# Altium PCB TYH-PD67W 2C1A 协议板0722.pcbdoc (part 1 of 2)
Units mm, origin at the board's own origin, x right, y up, seen from the top; angles counter-clockwise.
Board outline 32.75 x 24.76 mm, 5 copper layers (Top Layer, Signal Layer 3, Signal Layer 1, Signal Layer 2, Bottom Layer), stack 0.941 mm thick; 47 components, 178 nets, 247 pads, 161 vias.
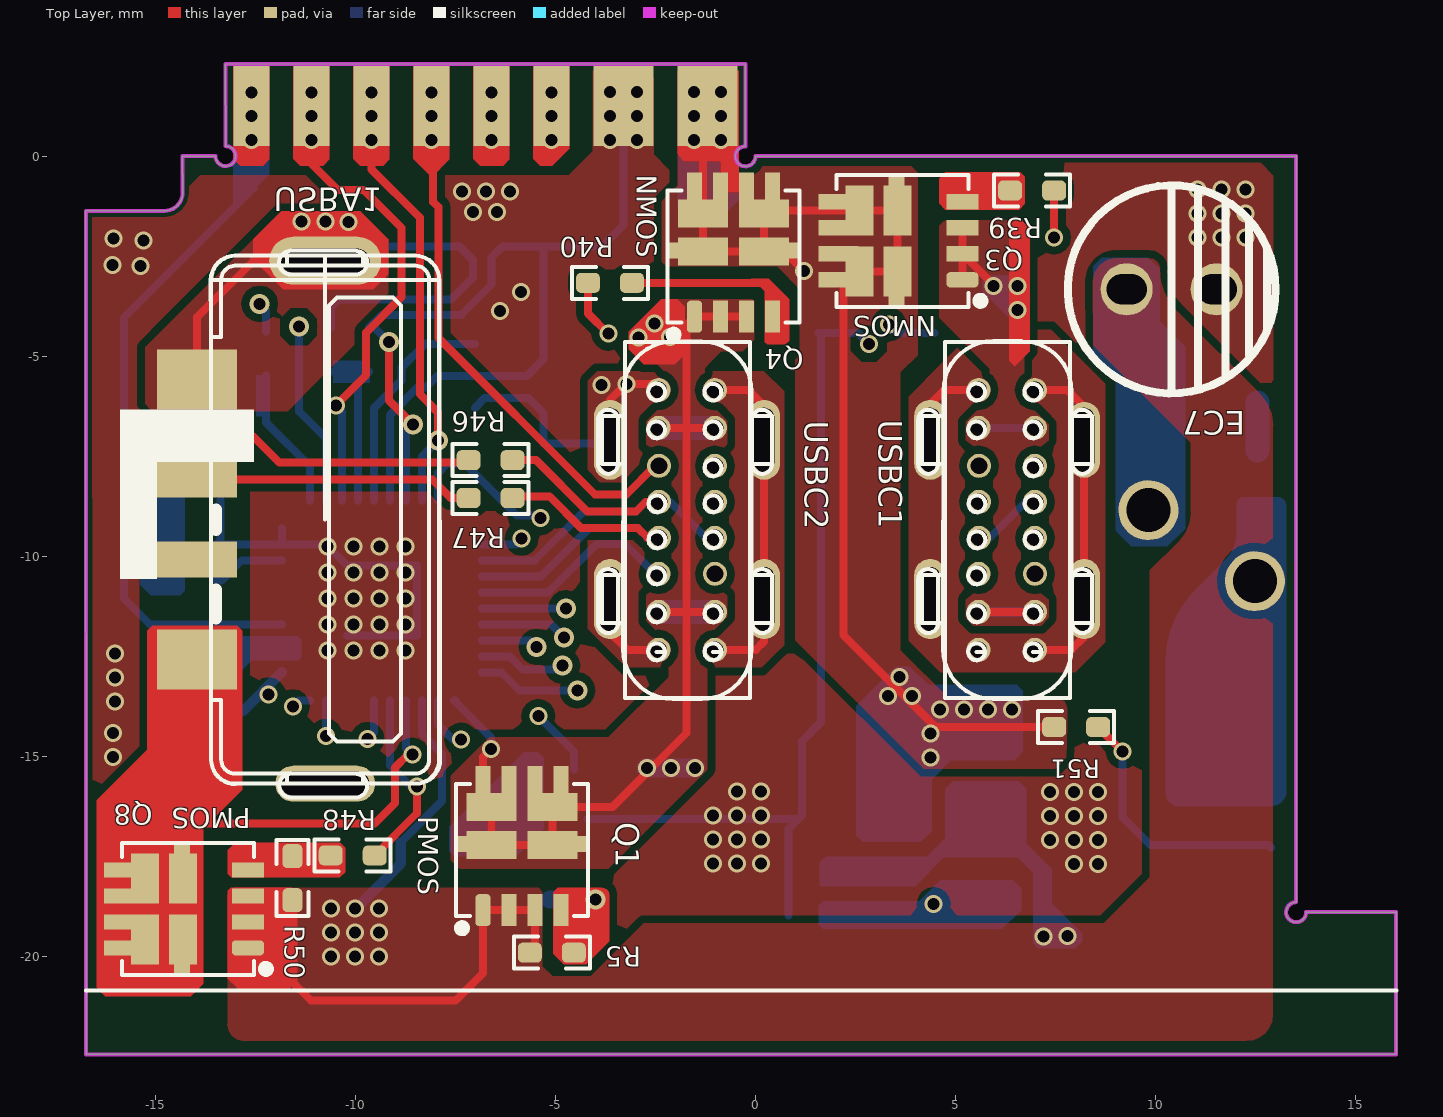
[diagram p0: Top Layer view]
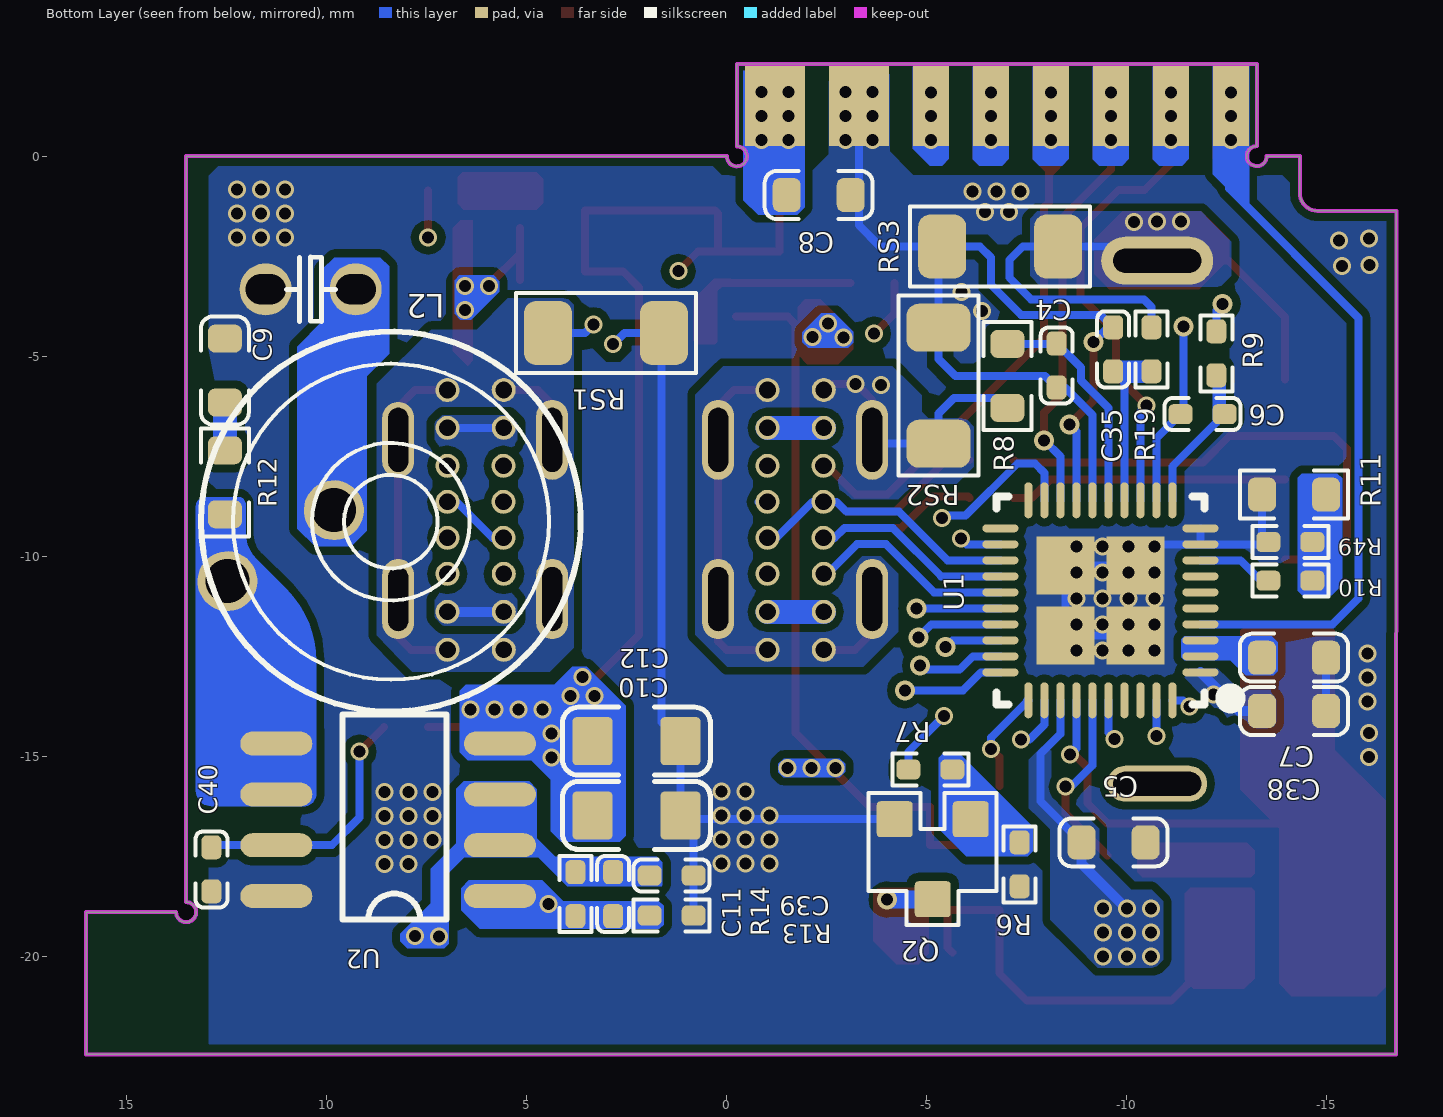
[diagram p1: Bottom Layer view, seen from below]
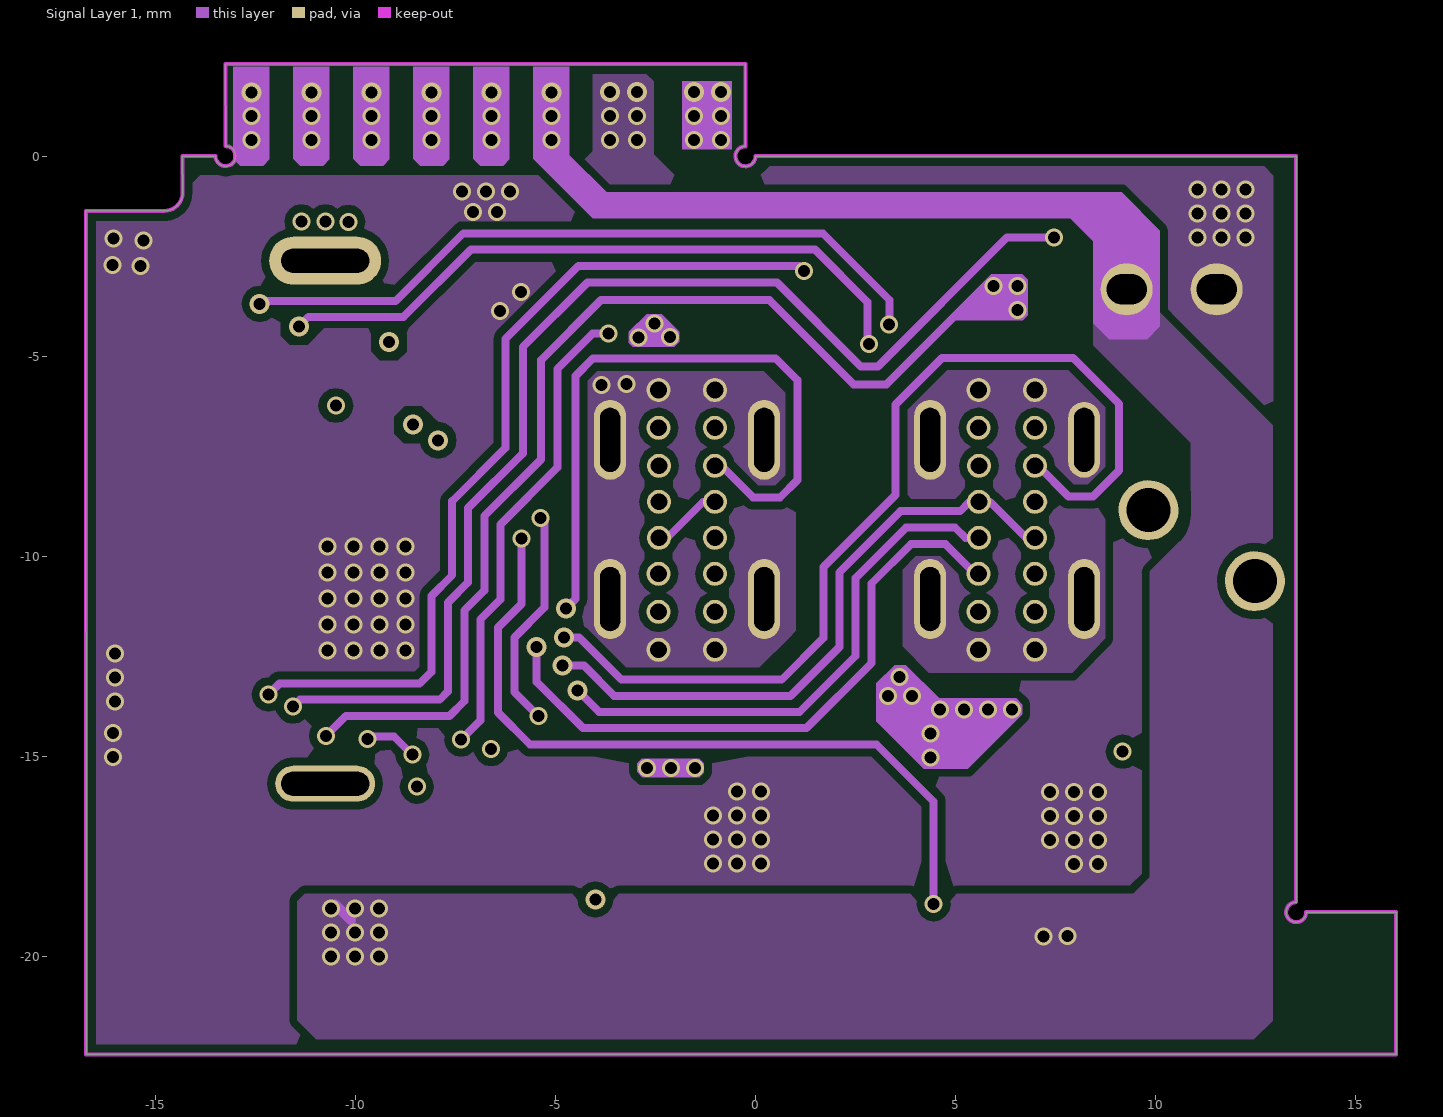
[diagram p2: Signal Layer 1]
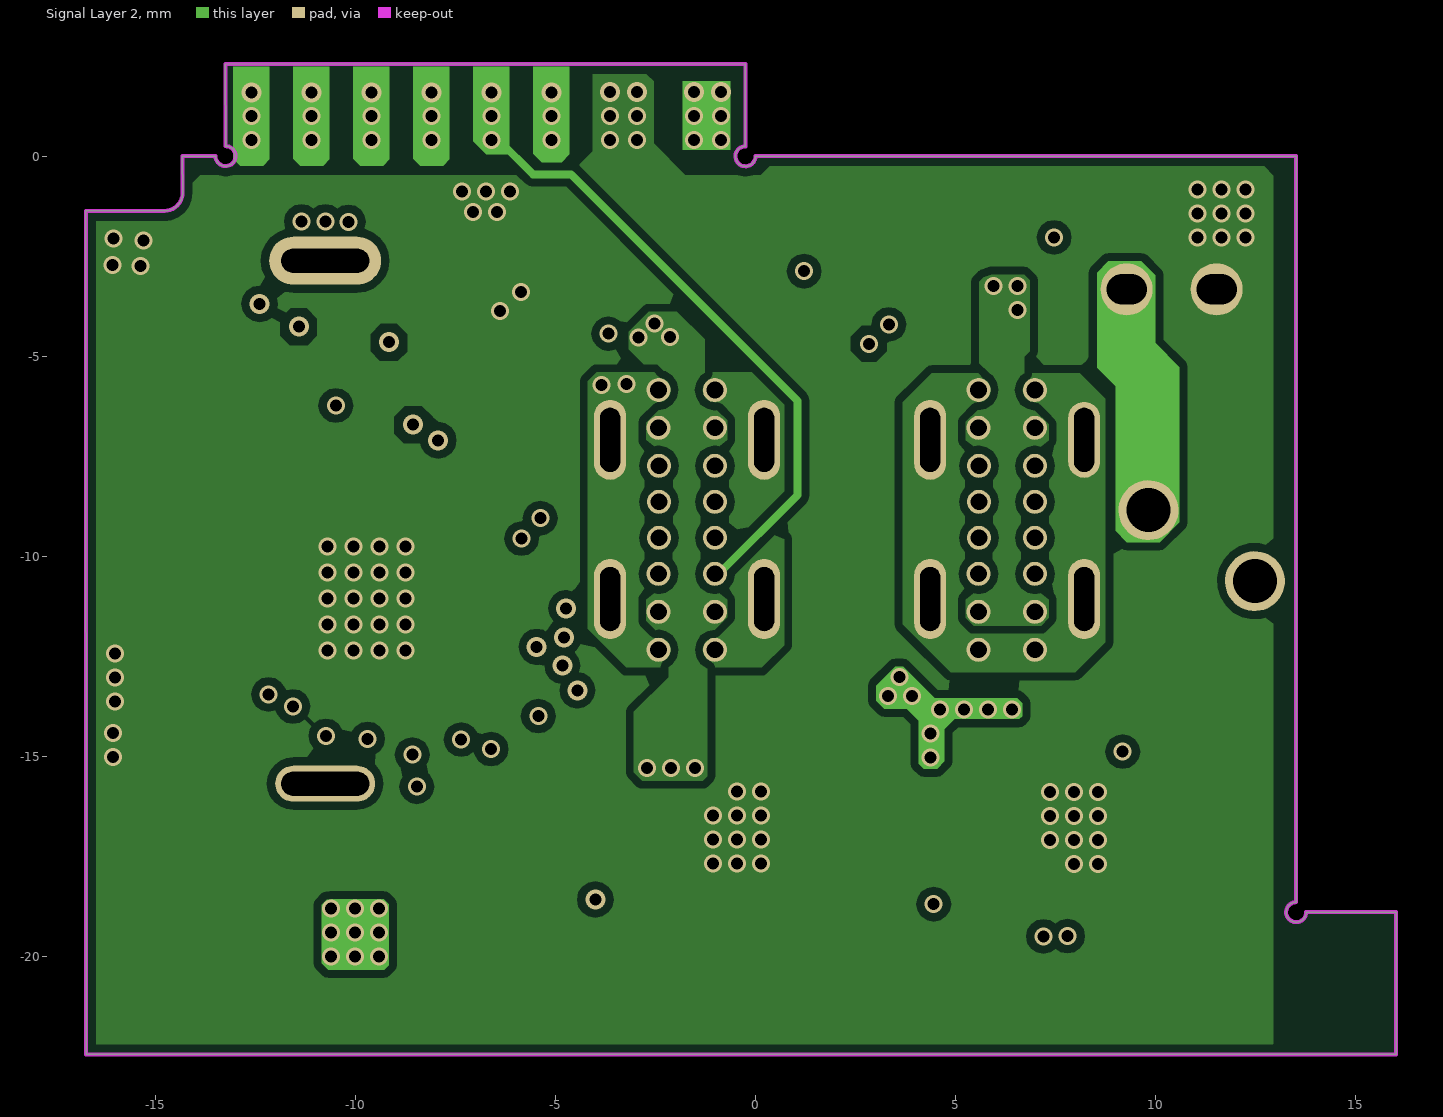
[diagram p3: Signal Layer 2]

## Layer stack, top to bottom
Top Solder: solder mask 0.0102, Solder Resist, Dk 3.5
Top Layer: signal copper 0.0356
Dielectric 1: core 0.254, FR-4, Dk 4.2
Signal Layer 3: signal copper 0.036
Dielectric 4: prepreg 0.127, Dk 4.2
Signal Layer 1: signal copper 0.036
Dielectric 2: core 0.254, Dk 4.2
Signal Layer 2: signal copper 0.036
Dielectric 3: prepreg 0.127, Dk 4.2
Bottom Layer: signal copper 0.0356
Bottom Solder: solder mask 0.0102, Solder Resist, Dk 3.5

## Board outline
-16.736,-22.453 -16.741,-1.367 -14.775,-1.363 ccw(c-14.776,-0.913) -14.326,-0.911 -14.33,0.004 -13.501,0.004 ccw(c-13.251,0.004) -13.251,0.254 -13.255,2.304 -13.255,2.303 -0.255,2.308 -0.255,2.304 -0.255,0.25 ccw(c-0.255,0) -0.005,0 -0.005,0.004 13.514,0.004 13.514,-18.646 ccw(c13.514,-18.896) 13.764,-18.896 16.014,-18.896 16.014,-22.453

## Design rules (kind name [scope] priority, off if disabled: settings)
Clearance Clearance_22 [InNet('HV') vs InNet('SW')] p1: gap=1.2
Clearance Clearance_21 [InNet('NetRX3_2') vs InNet('PGND')] p2: gap=1.5
Clearance Clearance_20 [InNet('NetBD1_1') vs InNet('PGND')] p3: gap=1.5
Clearance Clearance_19 [InNet('NetC4_2') vs InNet('PGND')] p4: gap=0.4
Clearance Clearance_18 [InNet('NetR15_1') vs InNet('PGND')] p5: gap=1
Clearance Clearance_17 [InNet('NetN_1') vs InNet('NetBD1_1')] p6: gap=1.55
Clearance Clearance_16 [InNet('NetN_1') vs InNet('PGND')] p7: gap=1.5
Clearance Clearance_15 [InNet('VIN') vs InNet('PGND')] p8 off: gap=5.8
Clearance Clearance_14 [InNet('CS') vs InNet('Bais-L')] p9: gap=0.45
Clearance Clearance_13 [InNet('SW') vs InNet('CS')] p10: gap=1.5
Clearance Clearance_12 [InNet('NetR15_1') vs InNet('CS')] p11: gap=1
Clearance Clearance_11 [InNet('NetBD1_3') vs InNet('CS')] p12: gap=1.1
Clearance Clearance_10 [InNet('HV') vs InNet('CS')] p13: gap=1.1
Clearance Clearance_9 [InNet('NetL2_1') vs InNet('CS')] p14: gap=1.5
Clearance Clearance_8 [InNet('NetC1_2') vs InNet('PGND')] p15: gap=1.2
Clearance Clearance_7 [InNet('NetBD1_3') vs InNet('PGND')] p16: gap=1.2
Clearance Clearance_6 [InNet('NetC2_2') vs InNet('PGND')] p17: gap=1.3
Clearance Clearance_5 [InNet('Bais-L') vs InNet('PGND')] p18: gap=0.45
Clearance Clearance_4 [InNet('SW') vs InNet('PGND')] p19: gap=1.5
Clearance Clearance_3 [InNet('HV') vs InNet('PGND')] p20: gap=1.2
Clearance Clearance_2 [InNet('NetL2_1') vs InNet('PGND')] p21: gap=1.5
Clearance Clearance_1 [OnLayer('Keep-Out Layer')] p22: gap=0.1
Clearance [All] p23: gap=0.2
PlaneConnect [All] p1: planeconnectstyle=Direct reliefexpansion=0.508 reliefentries=4 reliefconductorwidth=0.3 reliefairgap=0.254
PolygonConnect [All] p1: connectstyle=Direct reliefconductorwidth=0.3 reliefentries=4 polygonreliefangle="90 Angle" airgapwidth=0.3
RoutingVias [All] p1: holewidth=0.711 width=1.27 viastyle="Through Hole" minholewidth=0.711 minwidth=1.27 maxholewidth=0.711 maxwidth=1.27
SolderMaskExpansion [All] p1: expansion=0.05
Width [All] p1: maxlimit=10 minlimit=0.1 preferedwidth=0.2
28 further rules are at their usual default settings.

## Components (designator, comment, footprint, x,y, rotation, side; value= is the part's Value field where it differs from the comment)
C4 "0.1uF" 0402C -8.649,-4.279 r270 bottom
C5 "1uF" 0603CX -10.471,-17.151 r0 bottom
C6 "0.1uF" 0402C -12.847,-6.846 r0 bottom
C7 "1uF" 0603CX -13.383,-12.535 r180 bottom
C8 "1uF" 0603CX -1.501,-0.968 r180 bottom
C9 "100nF/50V/0603" 0603CX 12.546,-4.556 r270 bottom
C10 "2.2nF/250V/0805" 0805C 2.258,-16.481 r180 bottom
C11 "33nF/25V/0402" 0402C 3.238,-19.396 r90 bottom (schematic designator C21)
C12 "100nF/50V/0603" 0805C 2.258,-14.622 r180 bottom (schematic designator C9)
C35 "0.1uF" 0402C -9.262,-5.776 r90 bottom
C38 "1uF" 0603CX -14.984,-13.868 r0 bottom
C39 "33nF/25V/0402" 0402C 2.328,-17.579 r180 bottom (schematic designator C21)
C40 "33nF/25V/0402" 0402C 13.283,-18.777 r90 bottom (schematic designator C21)
EC7 "560uF/25V/6.3*16" EG-5*8L 9.413,-3.334 r90 top (schematic designator EC6)
L2 "Comment" L-T31125W 8.395,-9.134 r340 bottom
Q1 "PPM8PN03R10" DFN3*3 -6.603,-16.271 r0 top
Q2 "2N7002KL SOT-23" SOT-23_R -5.151,-17.573 r0 bottom (schematic designator Q8)
Q3 "PNM8PN30V50A" DFN3*3 2.595,-2.876 r90 top
Q4 "PNM8PN30V50A" DFN3*3 -1.314,-1.432 r0 top
Q8 "PPM8PN03R10" DFN3*3 -15.268,-19.578 r90 top
R5 "10K" 0402R#1 -5.646,-19.909 r0 top (schematic designator R4)
R6 "10K" 0402R#1 -7.325,-17.151 r270 bottom (schematic designator R4)
R7 "2K" 0402R#1 -4.54,-15.331 r180 bottom (schematic designator R4)
R8 "100R" 0603RX#1 -7.019,-5.489 r270 bottom (schematic designator R4)
R9 "100R" 0402r -12.239,-4.926 r270 bottom (schematic designator R4)
R10 "10K" 0402R#2 -14.09,-10.608 r0 bottom (schematic designator R4)
R11 "100K" 0603Rx -13.383,-8.456 r180 bottom (schematic designator R4)
R12 "10R/1206" 0603RX#2 12.546,-7.349 r270 bottom (schematic designator R6)
R13 "1K/0402" 0402R#1 1.928,-18.98 r180 bottom (schematic designator R22)
R14 "1K/0402" 0402R#1 3.783,-17.896 r270 bottom (schematic designator R22)
R19 "100R" 0402R#1 -10.619,-4.276 r270 bottom (schematic designator R4)
R39 "100R" 0402R#1 7.463,-0.855 r180 top (schematic designator R4)
R40 "100R" 0402R#1 -3.092,-3.163 r180 top (schematic designator R4)
R46 "100R" 0402R#1 -6.075,-7.596 r180 top (schematic designator R4)
R47 "100R" 0402R#1 -6.075,-8.54 r180 top (schematic designator R4)
R48 "100R" 0402R#1 -10.622,-17.477 r0 top (schematic designator R4)
R49 "10K" 0402R#2 -14.09,-9.642 r0 bottom (schematic designator R4)
R50 "100R" 0402R#1 -11.578,-18.597 r90 top (schematic designator R4)
R51 "1K/0402" 0402R#1 8.563,-14.269 r180 top (schematic designator R22)
RS1 "5mR/1206/1%" 1206RA 0.82,-5.418 r0 bottom (schematic designator RS2)
RS2 "5mR/1206" 1206RA -4.298,-7.935 r90 bottom
RS3 "5mR/1206" 1206RA -4.636,-1.253 r180 bottom (schematic designator RS2)
U1 "Comment" "QFN40 5*5" -9.343,-11.1 r0 bottom
U2 "Comment" SO-8S 5.671,-18.493 r90 bottom
USBA1 "Comment" "USB AF SMD-L" -10.761,-9.084 r180 top locked
USBC1 "Comment" "USB C 16P 立式"#1 6.298,-9.093 r270 top locked
USBC2 "Comment" "USB C 16P 立式"#2 -1.703,-9.093 r270 top locked

## Footprints (in the part's own frame and the unit in brackets; to place one, negate y for a bottom-side part, rotate by r counter-clockwise, add the part's x,y. Pads: shape width x height; smd on the part's side, far side on the other; paste and mask are expansions set on the pad)
0402C [mm]
  rrect50% 0.6x0.5 smd: 1(0.4,-0.4) 2(1.5,-0.4)
  silkscreen extent 0,-0.8 1.9,0, body extent 0.45,-0.66 1.45,-0.14, height 0.53
0402R#1 [mm]
  rrect50% 0.6x0.5 smd: 1(0,0) 2(1.1,0)
  silkscreen extent -0.4,-0.4 1.5,0.4, body extent 0.05,-0.25 1.05,0.25, height 0.3
0402R#2 [mm]
  rrect50% 0.6x0.5 smd: 1(-0.55,0) 2(0.55,0)
  silkscreen extent -0.95,-0.4 0.95,0.4, body extent -0.5,-0.25 0.5,0.25, height 0.3
0402r [mm]
  rrect50% 0.6x0.5 smd: 1(-0.55,0) 2(0.55,0)
  silkscreen extent -0.95,-0.4 0.95,0.4, body extent -0.5,-0.25 0.5,0.25, height 0.3
0603CX [mm]
  rrect50% 0.7x0.85 smd: 1(0,0) 2(1.6,0)
  silkscreen extent -0.55,-0.6 2.15,0.6, body extent 0,-0.41 1.6,0.41, height 0.81
0603RX#1 [mm]
  rrect50% 0.7x0.85 smd: 1(-0.8,0) 2(0.8,0)
  silkscreen extent -1.35,-0.6 1.35,0.6, body extent -0.77,-0.42 0.78,0.43, height 0.45
0603RX#2 [mm]
  rrect50% 0.7x0.85 smd: 1(0,0) 2(1.6,0)
  silkscreen extent -0.55,-0.6 2.15,0.6, body extent 0.03,-0.42 1.58,0.43, height 0.45
0603Rx [mm]
  rrect50% 0.7x0.85 smd: 1(0,0) 2(1.6,0)
  silkscreen extent -0.55,-0.6 2.15,0.6, body extent 0.03,-0.42 1.58,0.43, height 0.45
0805C [mm]
  rrect20% 1x1.2 smd: 1(-1.099,0.001) 2(1.101,0.001)
  silkscreen extent -1.85,-0.85 1.85,0.85, body extent -1,-0.61 1,0.61, height 0.51
1206RA [mm]
  rrect50% 1.2x1.6 smd mask+0.03: 1(3.65,-1) 2(0.75,-1)
  silkscreen extent -0.05,-2 4.45,0, body extent 0.6,-1.8 3.8,-0.2, height 0.55
DFN3*3 [mm]
  rrect50% 0.38x0.8 smd: 1(-0.212,-2.576)
  rect 0.38x0.8 smd: 2(0.438,-2.576) 3(1.088,-2.576) 4(1.738,-2.576)
  rect 0.38x1 smd: 5(1.738,0.524) 6(1.088,0.524) 7(0.438,0.524) 8(-0.212,0.524)
  rect 0.8x0.4 smd: 8(-0.458,-0.926) 8(2.034,-0.926)
  rect 1.25x0.7 smd: 8(0,-0.952) 8(0,0) 8(1.526,-0.952) 8(1.526,0)
  silkscreen extent -0.89,-3.18 2.41,0.57, body extent -0.89,-2.74 2.41,0.58, height 0.75
EG-5*8L [mm]
  round 1.3 hole 0.75 slot 1 at 90 deg: 1(0.009,0.137) 2(0.009,-2.113)
  silkscreen extent -2.59,-3.59 2.61,1.61, body extent -2.49,-3.49 2.51,1.51, height 7
L-T31125W [mm]
  round 1.5 hole 1.1: 1(1.241,-0.758) 2(4.35,0)
  silkscreen extent -4.75,-4.75 4.75,4.75, body extent -4.77,-4.77 4.77,4.77, height 4.86
"QFN40 5*5" [mm]
  oval 0.9x0.2 smd: 1(-2.5,1.8) 2(-2.5,1.4) 3(-2.5,1) 4(-2.5,0.6) 5(-2.5,0.2) 6(-2.5,-0.2) 7(-2.5,-0.6) 8(-2.5,-1) 9(-2.5,-1.4) 10(-2.5,-1.8) 21(2.5,-1.8) 22(2.5,-1.4) 23(2.5,-1) 24(2.5,-0.6) 25(2.5,-0.2) 26(2.5,0.2) 27(2.5,0.6) 28(2.5,1) 29(2.5,1.4) 30(2.5,1.8)
  oval 0.2x0.9 smd: 11(-1.8,-2.5) 12(-1.4,-2.5) 13(-1,-2.5) 14(-0.6,-2.5) 15(-0.2,-2.5) 16(0.2,-2.5) 17(0.6,-2.5) 18(1,-2.5) 19(1.4,-2.5) 20(1.8,-2.5) 31(1.8,2.5) 32(1.4,2.5) 33(1,2.5) 34(0.6,2.5) 35(0.2,2.5) 36(-0.2,2.5) 37(-0.6,2.5) 38(-1,2.5) 39(-1.4,2.5) 40(-1.8,2.5)
  rect 1.45x1.45 smd: 41(-0.875,-0.875) 41(-0.875,0.875) 41(0.875,-0.875) 41(0.875,0.875)
  silkscreen extent -3.37,-2.6 2.6,2.6, body extent -2.45,-2.45 2.45,2.45, height 0.8
SO-8S [mm]
  oval 0.6x1.8 smd: 1(0,0) 2(1.27,0) 3(2.54,0) 4(3.81,0) 5(3.81,5.588) 6(2.54,5.588) 7(1.27,5.588) 8(0,5.588)
  silkscreen extent -0.59,1.34 4.54,3.94, body extent -0.59,-0.26 4.41,5.74, height 1.9
SOT-23_R [mm]
  rrect20% 0.9x0.9 smd: 1(-0.95,-1) 2(0.95,-1) 3(0,1)
  silkscreen extent -1.6,-1.65 1.6,1.65, body extent -1.46,-1.44 1.44,1.36, height 1.2
"USB AF SMD-L" [mm]
  oval 2.5x0.9 hole 0.6 slot 2.2 at 0 deg: 0(0,6.6)
  oval 2.8x1.2 hole 0.6 slot 2.2 at 0 deg: 0(0,-6.475)
  rect 2x1.5 smd: +(3.198,3.5) -(3.198,-3.5)
  rect 2x0.9 smd: D+P(3.198,-1) D-M(3.198,1)
  silkscreen extent -2.85,-6.6 2.85,6.6, body extent -2.9,-6.61 3.42,6.61, height 10
"USB C 16P 立式"#1 [mm]
  round 0.6 hole 0.42: CC1(-1.355,0.685) CC2(1.345,-0.725) DM(-0.455,-0.715) DM(0.445,0.685) DP(-0.455,0.685) DP(0.445,-0.715) GND(-3.253,-0.723) GND(-3.247,0.684) GND(3.245,-0.725) GND(3.245,0.685) SBU1(1.345,0.685) SBU2(-1.355,-0.715) VBUS(-2.305,-0.725) VBUS(-2.305,0.685) VBUS(2.295,-0.725) VBUS(2.295,0.685)
  oval 2x0.8 hole 0.5 slot 1.6 at 0 deg: GND(-2.005,-1.935) GND(1.975,1.915) GND(1.975,-1.935)
  oval 1.9x0.8 hole 0.5 slot 1.6 at 0 deg: GND(-2.005,1.915)
  silkscreen extent -4.45,-2.13 4.46,2.12, body extent -4.47,-2.08 4.47,2.08, height 10
"USB C 16P 立式"#2 [mm]
  round 0.6 hole 0.42: CC1(-1.355,0.685) CC2(1.345,-0.725) DM(-0.455,-0.715) DM(0.445,0.685) DP(-0.455,0.685) DP(0.445,-0.715) GND(-3.253,-0.723) GND(-3.247,0.684) GND(3.245,-0.725) GND(3.245,0.685) SBU1(1.345,0.685) SBU2(-1.355,-0.715) VBUS(-2.305,-0.725) VBUS(-2.305,0.685) VBUS(2.295,-0.725) VBUS(2.295,0.685)
  oval 2x0.8 hole 0.5 slot 1.6 at 0 deg: GND(-2.005,-1.935) GND(-2.005,1.915) GND(1.975,1.915) GND(1.975,-1.935)
  silkscreen extent -4.45,-2.13 4.46,2.12, body extent -4.47,-2.08 4.47,2.08, height 10

## Part data
C9 C12: library part "Cap Semi", "Capacitor (Semiconductor SIM Model)"
C10: library part CAP
C11 C39 C40: library part Cap, "Capacitor"
EC7: library part CAPACITOR, "C?"
Q2: library part NMOS
R5 R6 R7 R8 R9 R10 R11 R19 R39 R40 R46 R47 R48 R49 R50 RS1 RS2 RS3: library part RES, "Resistor"
R12 R13 R14 R51: library part Res1, "Resistor"

## Free pads (board coordinates)
  rect 1.5x2 smd far side: 0(-3.305,1.254) 1(-1.205,1.254)
  rect 1.5x2 smd: 0(-3.305,1.254) 1(-1.205,1.254)
  rect 0.9x2 smd far side: 2(-12.605,1.254) 2(-11.105,1.254) 2(-9.605,1.254) 2(-8.105,1.254) 2(-6.605,1.254) 2(-5.105,1.254)
  rect 0.9x2 smd: 2(-12.605,1.254) 2(-11.105,1.254) 2(-9.605,1.254) 2(-8.105,1.254) 2(-6.605,1.254) 2(-5.105,1.254)

## Via types
v1: diameter 0.45, hole 0.3, Top Layer to Bottom Layer, tented both sides, 140 vias
v2: diameter 0.5, hole 0.3, Top Layer to Bottom Layer, tented both sides, 21 vias

## Nets (pads, with @x,y where several pads share a name; then routed paths per layer and width w, separated by ;. In a path a pad name is that pad's centre, name@x,y a point inside that pad or via, vN(x,y) a via of type N, cw(c..) or ccw(c..) an arc to the next point about the centre after c; other vN are vias at no path point)
3.3V: 
A: 
A+: Q8.5 Q8.6 Q8.7 Q8.8 U1.34 U1.36 USBA1.+ | length 19.7
  Top Layer w0.2: Q8.8@-15.008,-17.645 -15.008,-19.171 -14.056,-19.171 -13.96,-19.075 -13.96,-16.678 ; -14.112,-16.678 -13.96,-16.678 ; USBA1.+@-13.96,-12.584 -13.96,-16.678 ; v1(-8.584,-14.96) -8.697,-14.96 -9.016,-15.28 -9.016,-16.172 -9.522,-16.678 -13.96,-16.678
  Signal Layer 1 w0.2: v1(-9.699,-14.563) -9.635,-14.499 -9.045,-14.499 v1(-8.584,-14.96)
  Bottom Layer w0.2: v1(-9.699,-14.563) -9.543,-14.407 U1.36@-9.543,-13.6 ; U1.34@-8.743,-13.6 -8.743,-14.801 v1(-8.584,-14.96)
A-: R19.1 RS3.1 USBA1.0@-10.761,-2.609 USBA1.- | length 14.1
  Top Layer w0.2: USBA1.-@-13.96,-5.584 -13.96,-4.021 -12.548,-2.609 USBA1.0@-10.761,-2.609
  Bottom Layer w0.2: USBA1.0@-10.761,-2.609 -10.406,-2.254 RS3.1@-8.286,-2.254 -7.401,-2.254 -7.066,-2.59 -7.066,-3.031 -7.613,-3.579 -10.431,-3.579 -10.619,-3.766 R19.1@-10.619,-4.276
  other v1: -11.355,-1.627 -10.752,-1.627 -10.179,-1.639
BACK_LED: 
Bais-L: 
BOOT0: 
BUTTON: 
CC1: 
CC2: 
CPA: C35.1 R19.2 U1.14 | length 4.3
  Bottom Layer w0.2: R19.2@-10.619,-5.376 C35.1@-9.662,-5.376 -9.943,-5.657 U1.14@-9.943,-8.6
CS: 
D: 
D25_INT: 
D31_EN1: 
D31_EN2: 
D31_INT1: 
D+: R47.2 USBA1.D+P | length 7
  Top Layer w0.2: USBA1.D+P@-13.96,-8.084 -8.08,-8.084 -7.624,-8.54 R47.2@-7.175,-8.54
D-: R46.2 USBA1.D-M | length 12.8
  Top Layer w0.2: USBA1.D-M@-13.96,-10.084 -15.088,-10.084 -15.502,-9.67 -15.502,-7.316 -15.172,-6.986 -12.574,-6.986 -11.907,-7.654 -7.233,-7.654 R46.2@-7.175,-7.596
DM: 
DP: 
EM: 
EN: C40.2 R51.1 U2.7 | length 6.5
  Top Layer w0.2: R51.1@8.563,-14.269 v1(9.178,-14.884)
  Bottom Layer w0.2: v1(9.178,-14.884) 9.178,-16.529 9.873,-17.223 U2.7@11.259,-17.223 12.829,-17.223 C40.2@12.883,-17.277
EN_IC: 
FB: 
FLASH_CLK: 
FLASH_CS: 
FLASH_MISO: 
FLASH_MOSI: 
G-SR: 
GND-C: 
HV: 
ISET: 
KEY: 
KEY1: 
LCD_CS: 
LCD_DC: 
LCD_EN2: 
LCD_MOSI: 
LCD_RES: 
LCD_TE: 
LEDA: 
M: 
N: 
NetBD1_1: 
NetBD1_3: 
NetBD2_1: 
NetC1_1: 
NetC1_2: 
NetC2_2: 
NetC3_2: 
NetC4_1: 
NetC4_2: 
NetC5_2: 
NetC6_1: 
NetC10_2: 
NetC21_1: 
NetC22_1: C9.2 R12.1 | length 1.2
  Bottom Layer w0.6: R12.1@12.546,-7.349 C9.2@12.546,-6.155
NetC24_1: 
NetC25_2: 
NetC26_2: 
NetC30_2: 
NetC31_2: 
NetC100_2: 
NetC101_1: 
NetC101_2: 
NetC112_1: 
NetD4_K: 
NetF1_1: 
NetF1_2: 
NetKEY1_1: 
NetL2_1: 
NetLF1_2: 
NetN_1: 
NetNTC2_1: 
NetQ1_3: 
NetQ3_4: 
NetQ3_G: 
NetR3_1: 
NetR4_1: 
NetR15_1: 
NetR25_2: 
NetR29_1: 
NetR31_2: 
NetR32_2: 
NetR41_2: 
NetR42_2: 
NetR134_1: 
NetRX1_2: 
NetRX3_2: 
NetU1_26: 
NetU1_27: 
NetU1_28: 
NetU1_29: 
NetU1_30: 
NetU1_32: 
NewNet1: U1.25 USBC2.CC2 | length 5.2
  Bottom Layer w0.2: U1.25@-6.843,-10.9 -5.182,-10.9 -3.979,-9.697 -3.258,-9.697 -2.517,-10.438 USBC2.CC2@-2.428,-10.438
NewNet2: Q1.5 Q1.6 Q1.7 Q1.8 Q4.1 Q4.2 Q4.3 U1.31 USBC2.VBUS | length 27.6
  Top Layer w0.2: Q1.8@-6.815,-15.747 -6.815,-15.023 v1(-6.612,-14.82) ; Q1.8@-6.603,-16.271 Q1.8@-6.603,-17.223 Q1.8@-5.077,-17.223 Q1.8@-5.077,-16.271 -3.581,-16.271 -1.723,-14.412 -1.723,-11.388 ; USBC2.VBUS@-2.428,-11.388 -1.723,-11.388 ; USBC2.VBUS@-2.428,-6.788 -1.723,-6.788 ; USBC2.VBUS@-1.018,-11.388 -1.723,-11.388 ; USBC2.VBUS@-1.018,-6.788 -1.723,-6.788 ; Q4.3@-0.226,-4.009 Q4.1@-1.526,-4.009 -1.723,-4.205 -1.723,-6.788 ; -1.723,-11.388 -1.723,-6.788
  Bottom Layer w0.2: U1.31@-7.505,-13.6 U1.31@-7.543,-13.6 -6.612,-14.531 v1(-6.612,-14.82)
  Bottom Layer w0.6: USBC2.VBUS@-2.428,-11.388 USBC2.VBUS@-1.018,-11.388 ; USBC2.VBUS@-2.428,-6.788 USBC2.VBUS@-1.018,-6.788
  other v1: -2.72,-15.287 -2.12,-15.287 -1.52,-15.287 -2.925,-4.524 -2.145,-4.521 -2.526,-4.179
NewNet3: R47.1 U1.24 USBC2.DP | length 11.4
  Top Layer w0.2: R47.1@-6.075,-8.54 -6.034,-8.499 -5.155,-8.499 -4.364,-9.289 -2.946,-9.289 USBC2.DP@-2.697,-9.538 ; USBC2.DP@-2.697,-9.538 USBC2.DP@-2.418,-9.538 USBC2.DP@-2.697,-9.538
  Signal Layer 1 w0.2: USBC2.DP@-2.418,-9.538 -2.211,-9.538 -1.311,-8.638 USBC2.DP@-1.018,-8.638
  Bottom Layer w0.2: U1.24@-6.843,-10.5 -5.362,-10.5 -4.152,-9.289 -2.946,-9.289 -2.697,-9.538 USBC2.DP@-2.418,-9.538 ; USBC2.DP@-1.018,-8.638 USBC2.DP@-0.8,-8.638
NewNet4: R46.1 U1.23 USBC2.DM | length 11.1
  Top Layer w0.2: R46.1@-6.075,-7.596 -5.489,-7.596 -4.2,-8.884 -2.994,-8.884 -2.748,-8.638 USBC2.DM@-2.418,-8.638
  Bottom Layer w0.2: U1.23@-6.843,-10.1 -5.52,-10.1 -4.304,-8.884 -2.994,-8.884 -2.748,-8.638 USBC2.DM@-2.418,-8.638 -2.142,-8.638 -1.242,-9.538 USBC2.DM@-1.018,-9.538
NewNet5: U1.26 USBC2.CC1 | length 19
  Signal Layer 1 w0.2: v2(-4.74,-11.3) -4.504,-11.064 -4.504,-5.491 -4.063,-5.05 0.497,-5.05 1.044,-5.597 1.044,-8.096 0.616,-8.525 -0.063,-8.525 -0.849,-7.738 USBC2.CC1@-1.018,-7.738
  Bottom Layer w0.2: U1.26@-6.843,-11.3 v2(-4.74,-11.3)
NewNet6: Q4.4 R40.1 R40.2 U1.32 | length 18.9
  Top Layer w0.2: R40.2@-4.192,-3.163 -4.192,-3.926 v1(-3.683,-4.436) ; R40.1@-3.092,-3.163 0.18,-3.163 0.424,-3.406 Q4.4@0.424,-4.009
  Signal Layer 1 w0.2: v1(-7.36,-14.581) -6.88,-14.1 -6.88,-11.574 -6.38,-11.074 -6.38,-9.202 -4.959,-7.781 -4.959,-5.317 -4.077,-4.436 v1(-3.683,-4.436)
  Bottom Layer w0.2: U1.32@-7.943,-13.6 -7.943,-14.208 -7.569,-14.581 v1(-7.36,-14.581)
NewNet7: 
NewNet8: U1.27 USBC1.CC1 | length 27
  Signal Layer 1 w0.2: v2(-4.792,-12.025) -4.415,-12.025 -3.355,-13.085 0.653,-13.085 1.7,-12.038 1.7,-10.264 3.499,-8.464 3.499,-6.206 4.662,-5.042 7.94,-5.042 9.084,-6.186 9.084,-7.854 8.436,-8.502 7.825,-8.502 7.061,-7.738 USBC1.CC1@6.983,-7.738
  Bottom Layer w0.2: U1.27@-6.843,-11.7 -5.117,-11.7 v2(-4.792,-12.025)
NewNet9: U1.29 USBC1.DM | length 17.8
  Signal Layer 1 w0.2: v2(-4.83,-12.733) -4.292,-12.733 -3.534,-13.49 0.874,-13.49 2.099,-12.265 2.099,-10.399 3.626,-8.873 5.114,-8.873 5.349,-8.638 5.857,-8.638 6.757,-9.538 USBC1.DM@6.983,-9.538
  Bottom Layer w0.2: U1.29@-6.843,-12.5 -6.155,-12.5 -5.82,-12.834 -4.932,-12.834 v2(-4.83,-12.733)
NewNet10: U1.30 USBC1.DP | length 18
  Signal Layer 1 w0.2: v2(-4.455,-13.35) -3.918,-13.887 1.103,-13.887 2.503,-12.487 2.503,-10.54 3.758,-9.285 4.99,-9.285 5.244,-9.538 USBC1.DP@5.583,-9.538 ; USBC1.DP@6.983,-8.638 USBC1.DP@7.192,-8.638
  Bottom Layer w0.2: U1.30@-6.843,-12.9 -6.357,-12.9 -5.907,-13.35 v2(-4.455,-13.35) ; USBC1.DP@5.583,-9.538 5.853,-9.538 6.753,-8.638 USBC1.DP@6.983,-8.638
NewNet11: U1.28 USBC1.CC2 | length 17.3
  Signal Layer 1 w0.2: v2(-5.475,-12.266) -5.475,-13.138 -4.317,-14.296 1.273,-14.296 2.902,-12.667 2.902,-10.676 3.881,-9.697 4.745,-9.697 5.486,-10.438 USBC1.CC2@5.573,-10.438
  Signal Layer 2 w0.2: USBC1.CC2@5.508,-10.438 USBC1.CC2@5.573,-10.438
  Bottom Layer w0.2: U1.28@-6.843,-12.1 -5.641,-12.1 v2(-5.475,-12.266)
NewNet12: 
NewNet13: Q1.4 Q2.3 R5.2 | length 3.3
  Top Layer w0.2: R5.2@-4.546,-19.909 -4.546,-19.166 Q1.4@-4.865,-18.847 -4.271,-18.847 v2(-4.004,-18.58)
  Bottom Layer w0.45: Q2.3@-5.143,-18.58 v2(-4.004,-18.58)
NewNet14: 
NewNet15: 
NewNet16: 
NewNet18: Q2.1 R6.1 R7.2 | length 2.9
  Bottom Layer w0.2: R6.1@-7.325,-17.151 -6.678,-17.151 Q2.1@-6.101,-16.573 -5.64,-16.113 R7.2@-5.64,-15.331
NewNet22: 
NewNet23: 
NewNet24: R8.2 RS2.2 USBC2.GND | length 17.3
  Top Layer w0.2: USBC2.GND@-3.638,-11.068 -3.638,-11.907 -3.206,-12.338 USBC2.GND@-2.428,-12.338 ; USBC2.GND@-3.638,-7.088 -3.638,-6.086 v1@-3.392,-5.841 ; v1(-3.226,-5.695) -2.571,-5.695 USBC2.GND@-2.426,-5.841 ; USBC2.GND@-1.019,-5.846 -0.189,-5.846 -0.184,-5.841 0.212,-6.238 0.212,-12.132 0.006,-12.338 USBC2.GND@-1.018,-12.338
  Bottom Layer w0.2: R8.2@-7.019,-6.289 -6.774,-6.044 -5.683,-6.044 -5.298,-6.429 RS2.2@-5.298,-7.185 USBC2.GND@-3.734,-7.185
  other v1: -3.853,-5.719
NewNet25: C4.1 R8.1 U1.15 | length 5.7
  Bottom Layer w0.2: U1.15@-9.543,-8.6 -9.543,-6.293 -8.854,-5.604 -8.854,-5.283 C4.1@-8.249,-4.679 ; C4.1@-8.239,-4.689 R8.1@-7.019,-4.689
NewNet28: Q3.4 R39.1 R39.2 U1.40 | length 32.5
  Top Layer w0.2: Q3.4@5.171,-1.137 5.453,-0.855 R39.2@6.363,-0.855 ; v1(7.463,-2.028) R39.1@7.463,-0.855
  Signal Layer 1 w0.2: v1(-11.567,-13.755) -11.396,-13.584 -7.899,-13.584 -7.69,-13.375 -7.69,-11.153 -7.187,-10.649 -7.187,-8.795 -5.82,-7.429 -5.82,-4.771 -4.206,-3.157 0.535,-3.157 2.629,-5.251 3.057,-5.251 6.28,-2.028 v1(7.463,-2.028)
  Bottom Layer w0.2: v1(-11.567,-13.755) -11.412,-13.6 U1.40@-11.143,-13.6
NewNet32: R10.1 R11.2 R49.1 | length 2.3
  Bottom Layer w0.2: R11.2@-14.983,-8.456 -14.64,-8.799 R10.1@-14.64,-10.608
NewNet33: pad.2@-12.605,1.254 U1.4 | length 17.9
  Bottom Layer w0.2: pad.2@-12.605,1.254 -12.605,-0.749 -12.554,-0.8 -15.796,-4.042 -15.796,-11.05 -15.146,-11.7 U1.4@-11.843,-11.7
  other v1: -12.602,0.403 -12.602,1.002
  other v2: -12.602,1.601
NewNet34: C7.1 U1.2 U1.3 | length 1.9
  Bottom Layer w0.2: C7.1@-13.347,-12.5 U1.2@-11.843,-12.5 U1.3@-11.843,-12.1
NewNet36: C6.1 R9.2 U1.11 | length 3.6
  Bottom Layer w0.2: R9.2@-12.239,-5.476 -12.239,-6.652 -11.143,-7.749 U1.11@-11.143,-8.6
NewNet38: R7.1 U1.19 | length 11.2
  Signal Layer 1 w0.2: v1(-5.434,-13.995) -6.03,-13.398 -6.03,-12.029 -5.282,-11.282 -5.282,-9.149 v1(-5.383,-9.048)
  Bottom Layer w0.2: U1.19@-7.943,-8.6 -7.943,-7.914 -7.713,-7.684 -7.265,-7.684 -5.969,-8.98 -5.451,-8.98 v1(-5.383,-9.048) ; v1(-5.434,-13.995) -4.54,-14.888 R7.1@-4.54,-15.331
NewNet40: 
NewNet41: Q3.1 Q3.2 Q3.3 U1.39 USBC1.VBUS | length 34.5
  Top Layer w0.2: Q3.1@5.171,-3.087 Q3.3@5.171,-1.787 ; Q3.2@5.171,-2.437 5.942,-3.208 v1(5.942,-3.238) ; USBC1.VBUS@5.573,-11.388 USBC1.VBUS@6.983,-11.388
  Signal Layer 1 w0.2: v1(-10.743,-14.488) -10.245,-13.991 -7.652,-13.991 -7.282,-13.621 -7.282,-11.354 -6.782,-10.855 -6.782,-8.995 -5.368,-7.58 -5.368,-5.098 -3.863,-3.594 0.342,-3.594 2.448,-5.7 3.275,-5.7 5.737,-3.238 v1(5.942,-3.238)
  Bottom Layer w0.2: v1(-10.743,-14.488) U1.39@-10.743,-13.6 ; USBC1.VBUS@5.573,-6.788 USBC1.VBUS@6.983,-6.788
  Bottom Layer w0.25: USBC1.VBUS@5.573,-11.388 USBC1.VBUS@6.983,-11.388
  other v1: 6.542,-3.838 6.542,-3.238
NewNet42: R9.1 RS1.1 USBC1.GND | length 31.3
  Top Layer w0.2: USBC1.GND@4.363,-11.818 USBC1.GND@4.363,-11.068 ; USBC1.GND@4.363,-7.088 4.363,-6.201 4.723,-5.841 USBC1.GND@5.574,-5.841 ; USBC1.GND@6.981,-5.846 7.788,-5.846 7.793,-5.841 8.213,-6.261 8.213,-12.017 7.891,-12.338 USBC1.GND@6.983,-12.338
  Signal Layer 1 w0.2: v2(-12.4,-3.691) -12.333,-3.623 -9.006,-3.623 -7.307,-1.924 1.68,-1.924 3.342,-3.586 v1@3.342,-4.192
  Bottom Layer w0.2: v2(-12.4,-3.691) -12.239,-3.851 R9.1@-12.239,-4.376 ; v1(3.331,-4.203) 3.545,-4.418 RS1.1@4.47,-4.418
OPTO: 
OTP: R10.2 U1.8 | length 1.9
  Bottom Layer w0.2: R10.2@-13.54,-10.608 -13.353,-10.608 -12.844,-10.1 U1.8@-11.843,-10.1
PA2: 
PA4: 
PA5: 
PA6: 
PA7: 
PA8: 
PA9: 
PB0: 
PB1: 
PB7: 
PF0: 
PF1: 
PF3: 
PGND: 
RS: 
RST: 
RX: 
SCL: pad.2@-9.605,1.254 U1.18 | length 9.9
  Top Layer w0.2: v1(-9.602,0.403) -9.602,-0.328 -8.393,-1.536 -8.393,-5.949 -7.937,-6.405 v2(-7.937,-7.099)
  Bottom Layer w0.2: U1.18@-8.343,-8.6 -8.343,-7.505 v2(-7.937,-7.099)
  other v1: -9.602,1.002
  other v2: -9.602,1.601
SCL1: 
SDA: pad.2@-11.105,1.254 U1.13 | length 11.4
  Top Layer w0.2: v1(-11.102,0.403) -11.102,-0.185 -10.45,-0.836 -9.802,-0.836 -8.85,-1.788 -8.85,-3.518 -9.734,-4.402 -9.734,-5.47 v1(-10.495,-6.23)
  Signal Layer 1 w0.2: -11.102,0.029 v1(-11.102,0.403)
  Bottom Layer w0.2: v1(-10.495,-6.23) -10.343,-6.382 U1.13@-10.343,-8.6
  other v1: -11.102,1.002
  other v2: -11.102,1.601
SDA1: 
SET: 
SGND: C4.2 C5.1 C6.2 C7.2 C8.2 C9.1 C10.2 C12.2 C35.2 C38.1 C39.2 C40.1 EC7.2 pad.0 Q2.2 R6.2 R11.1 R13.2 R49.2 RS1.2 RS2.1 RS3.2 U1.9 U1.10 U1.12 U1.16 U1.17 U1.41 U2.8 | length 79.7
  Top Layer w0.2: v2(-9.166,-4.642) -9.166,-6.104 v2(-8.568,-6.701)
  Signal Layer 1 w0.2: v2(-11.418,-4.25) -11.182,-4.013 -8.799,-4.013 -7.117,-2.331 1.484,-2.331 2.8,-3.648 2.8,-4.659 v1(2.838,-4.697)
  Bottom Layer w0.2: C38.1@-14.983,-13.866 C7.2@-14.983,-12.536 ; R11.1@-13.383,-8.456 -13.383,-9.601 -13.482,-9.7 U1.9@-11.843,-9.7 ; U1.10@-11.843,-9.3 U1.9@-11.843,-9.7 ; v2(-11.418,-4.25) -11.418,-6.375 C6.2@-11.347,-6.446 -10.743,-7.05 U1.12@-10.743,-8.6 ; U1.41@-10.218,-11.975 U1.41@-8.468,-11.975 U1.41@-8.468,-10.225 U1.41@-10.218,-10.225 -10.743,-9.7 U1.9@-11.843,-9.7 ; v2(-9.166,-4.642) -9.532,-4.276 C35.2@-9.662,-4.276 -9.348,-3.962 -7.359,-3.962 -6.607,-3.21 -6.607,-2.532 -6.328,-2.254 RS3.2@-5.386,-2.254 ; U1.16@-9.143,-8.6 -9.143,-6.464 -8.457,-5.779 C4.2@-8.249,-5.779 -7.959,-5.489 -5.719,-5.489 -5.298,-5.068 RS2.1@-5.298,-4.285 -5.298,-2.342 RS3.2@-5.386,-2.254 ; U1.17@-8.743,-8.6 -8.743,-6.876 v2(-8.568,-6.701) ; Q2.2@-4.201,-16.573 C10.2@1.063,-16.573 ; pad.0@-3.305,1.254 -3.305,-1.723 -3.835,-2.254 RS3.2@-5.386,-2.254 ; R13.2@0.828,-18.98 0.828,-16.808 C10.2@1.063,-16.573 ; RS1.2@1.57,-4.418 RS1.2@1.632,-4.418 ; v1(2.838,-4.697) 2.559,-4.418 RS1.2@1.632,-4.418 ; C10.2@1.063,-16.573 C10.2@1.156,-16.479 C12.2@1.156,-14.621 1.632,-14.145 RS1.2@1.632,-4.418
  other v1: -1.07,-17.684 -0.47,-17.684 0.13,-17.684 7.956,-17.692 8.556,-17.692 7.356,-17.092 7.956,-17.092 8.556,-17.092 -1.07,-17.084 -0.47,-17.084 0.13,-17.084 -1.07,-16.484 -0.47,-16.484 0.13,-16.484 7.356,-16.492 7.956,-16.492 8.556,-16.492 -0.47,-15.884 0.13,-15.884 7.356,-15.892 7.956,-15.892 8.556,-15.892 -16.063,-15.017 -16.063,-14.417 -16.021,-13.626 -16.021,-13.026 -16.021,-12.426 -10.699,-12.352 -10.049,-12.352 -9.399,-12.352 -8.749,-12.352 -10.699,-11.702 -10.049,-11.702 -9.399,-11.702 -8.749,-11.702 -10.699,-11.052 -10.049,-11.052 -9.399,-11.052 -8.749,-11.052 -10.699,-10.402 -10.049,-10.402 -9.399,-10.402 -8.749,-10.402 -10.699,-9.752 -10.049,-9.752 -9.399,-9.752 -8.749,-9.752 -6.385,-3.87 -5.871,-3.39 -15.379,-2.745 -16.074,-2.723 -15.302,-2.104 -16.052,-2.061 11.049,-2.025 11.649,-2.025 12.249,-2.025 11.049,-1.425 11.649,-1.425 12.249,-1.425 -7.061,-1.396 -6.461,-1.396 -7.342,-0.88 -6.742,-0.88 -6.142,-0.88 11.049,-0.825 11.649,-0.825 12.249,-0.825 -3.643,0.411 -2.967,0.411 -3.643,1.01 -2.967,1.01
  other v2: -3.643,1.609 -2.967,1.609
SRCG_A: Q8.4 R48.1 R48.2 R50.2 U1.35 | length 4.7
  Top Layer w0.2: R48.2@-9.522,-17.477 -8.47,-16.425 v1(-8.47,-15.759)
  Bottom Layer w0.2: U1.35@-9.143,-13.6 -9.143,-15.225 -8.608,-15.759 v1(-8.47,-15.759)
SW: 
SW-SR: L2.2 R12.2 U2.5 U2.6 | length 7.4
  Bottom Layer w0.2: U2.6@11.259,-15.953 11.259,-11.846 L2.2@12.483,-10.622 ; L2.2@12.546,-10.559 R12.2@12.546,-8.949
SWCLK: 
SWCLK1: 
SWCLK2: pad.2@-8.105,1.254 USBC2.SBU2 | length 12.4
  Top Layer w0.2: v1(-8.102,0.403) -8.062,0.363 -8.062,-1.138 -7.928,-1.271 -7.928,-4.542 -4.022,-8.449 -3.222,-8.449 -2.512,-7.738 USBC2.SBU2@-2.418,-7.738
  other v1: -8.102,1.002
  other v2: -8.102,1.601
SWDIO: 
SWDIO1: 
SWDIO2: pad.2@-6.605,1.254 USBC2.SBU1 | length 15.7
  Signal Layer 1 w0.2: v1@-6.602,0.271 v1(-6.602,0.403)
  Signal Layer 2 w0.2: v1(-6.602,0.403) -6.421,0.403 -5.561,-0.458 -4.61,-0.458 1.044,-6.112 1.044,-8.472 -0.922,-10.438 USBC2.SBU1@-1.018,-10.438
  other v1: -6.602,1.002
  other v2: -6.602,1.601
SWRST: 
TX: 
TXD: 
U2-2: 
V3V3: 
VBUS: 
VC: 
VDD: 
VDD1: 
VDS: 
VFB: 
VFB1: C11.1 R13.1 R14.2 U1.22 U2.1 | length 24
  Signal Layer 1 w0.2: v1(-5.852,-9.556) -5.852,-11.194 -6.439,-11.78 -6.439,-13.905 -5.644,-14.699 3.017,-14.699 4.452,-16.134 v1(4.452,-18.698)
  Bottom Layer w0.2: U1.22@-6.843,-9.7 -5.996,-9.7 v1(-5.852,-9.556) ; R13.1@1.928,-18.98 C11.1@2.838,-18.98 ; C11.1@2.838,-18.996 4.155,-18.996 v1(4.452,-18.698) 4.657,-18.493 U2.1@5.671,-18.493